# Altium PCB Driver_BLDC.PcbDoc (part 1 of 4)
Units mm, origin at the board's own origin, x right, y up, seen from the top; angles counter-clockwise.
Board outline 320 x 180.01 mm, 2 copper layers (Top Layer, Bottom Layer), stack 1.371 mm thick; 421 components, 171 nets, 1112 pads, 449 vias.
Unrouted connection lines stored in the file: 1.
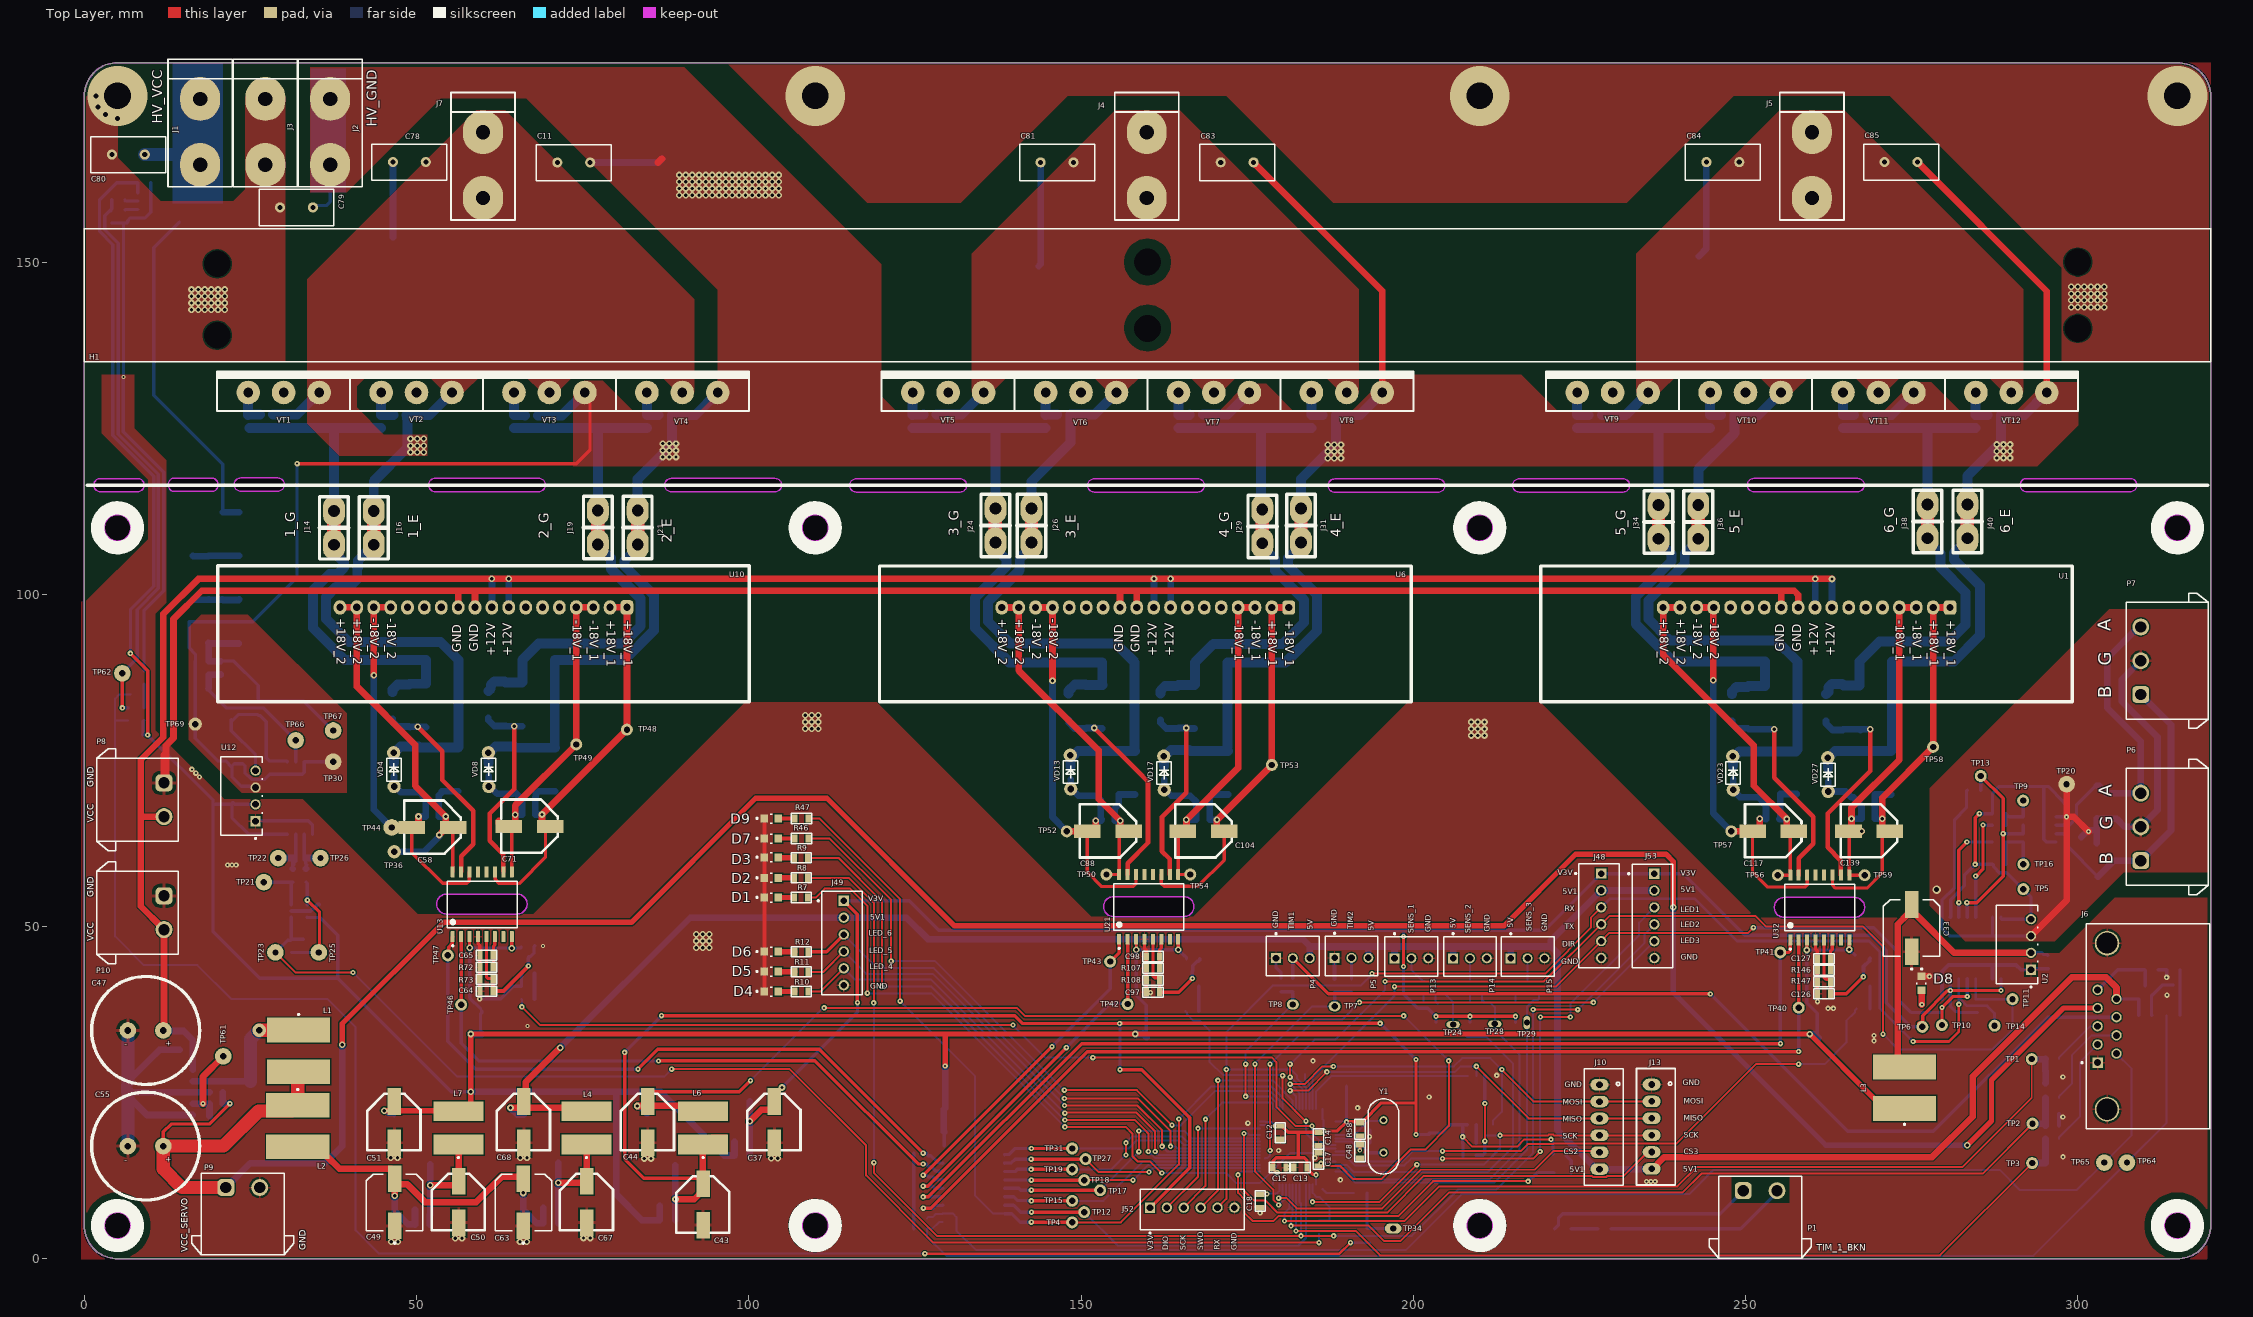
[diagram p0: Top Layer view]
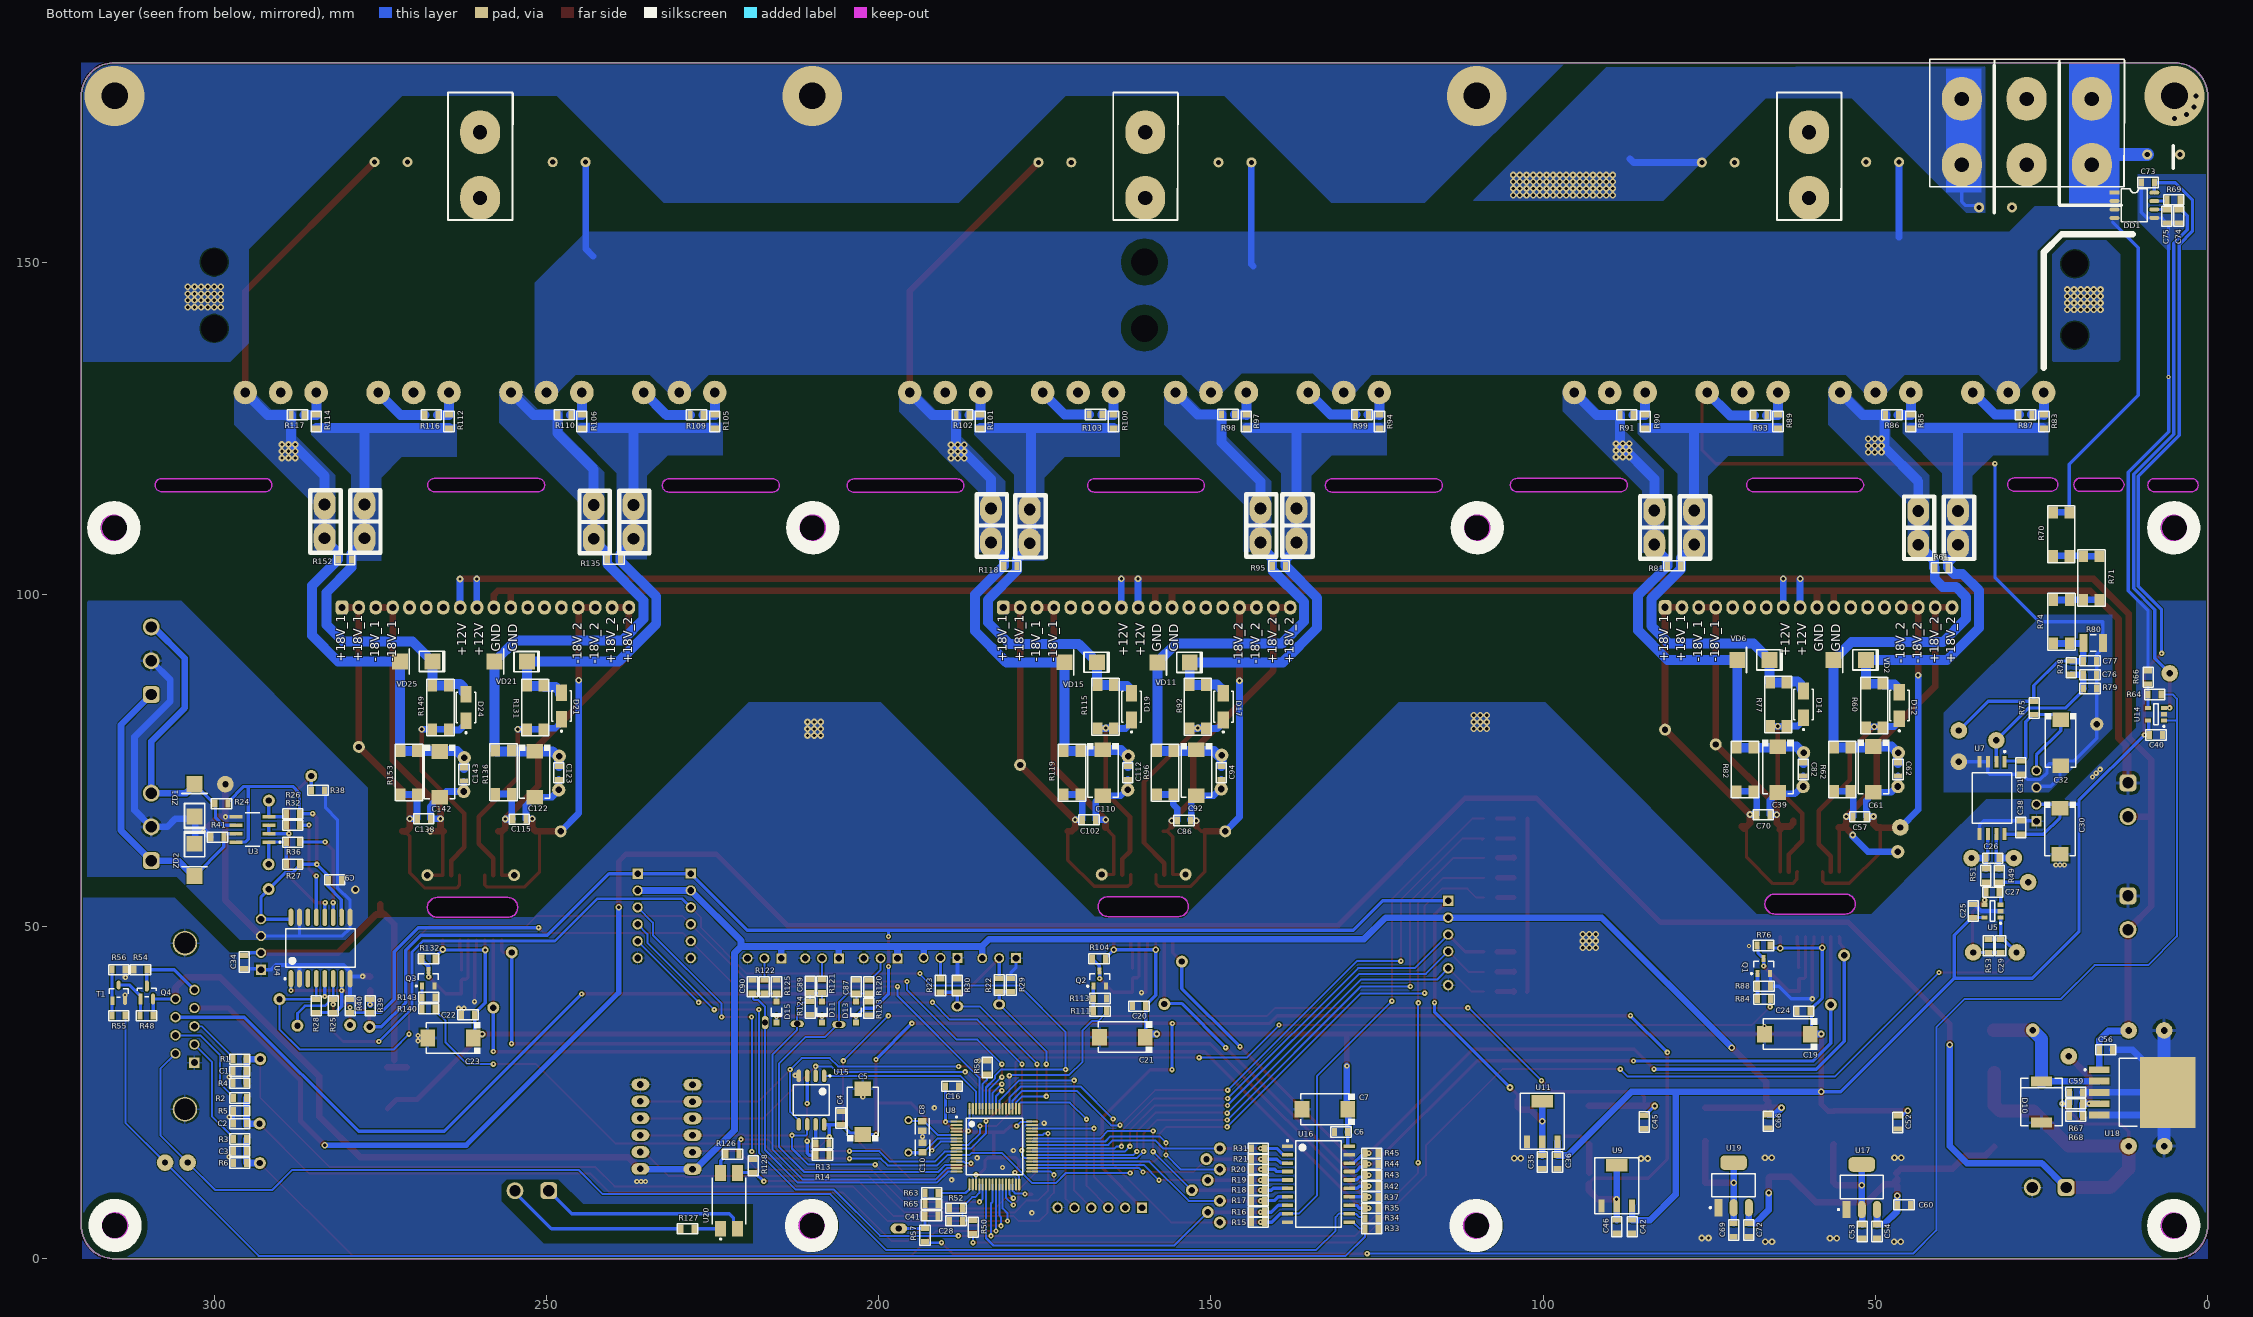
[diagram p1: Bottom Layer view, seen from below]
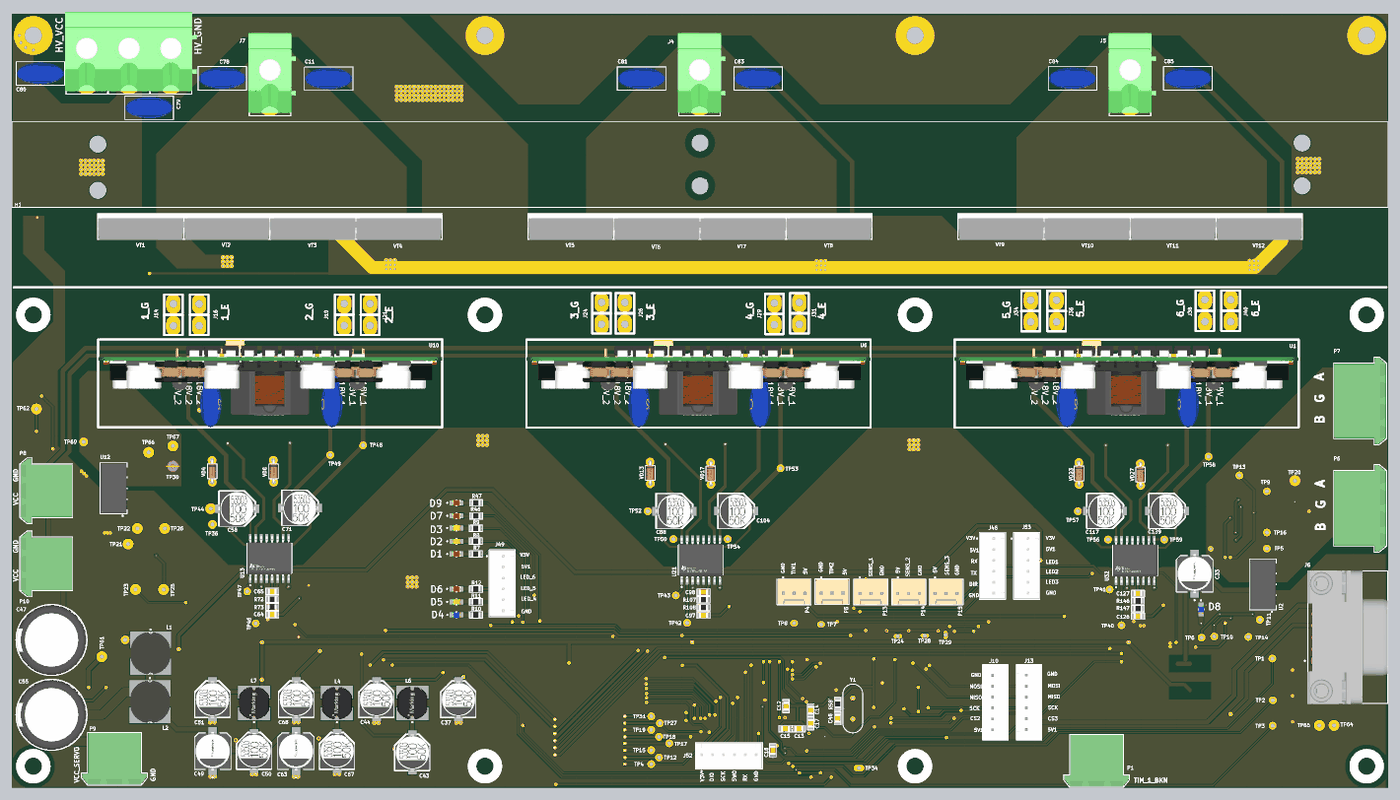
[diagram p4: 3D render of the assembled board from above, using the file's embedded part models]
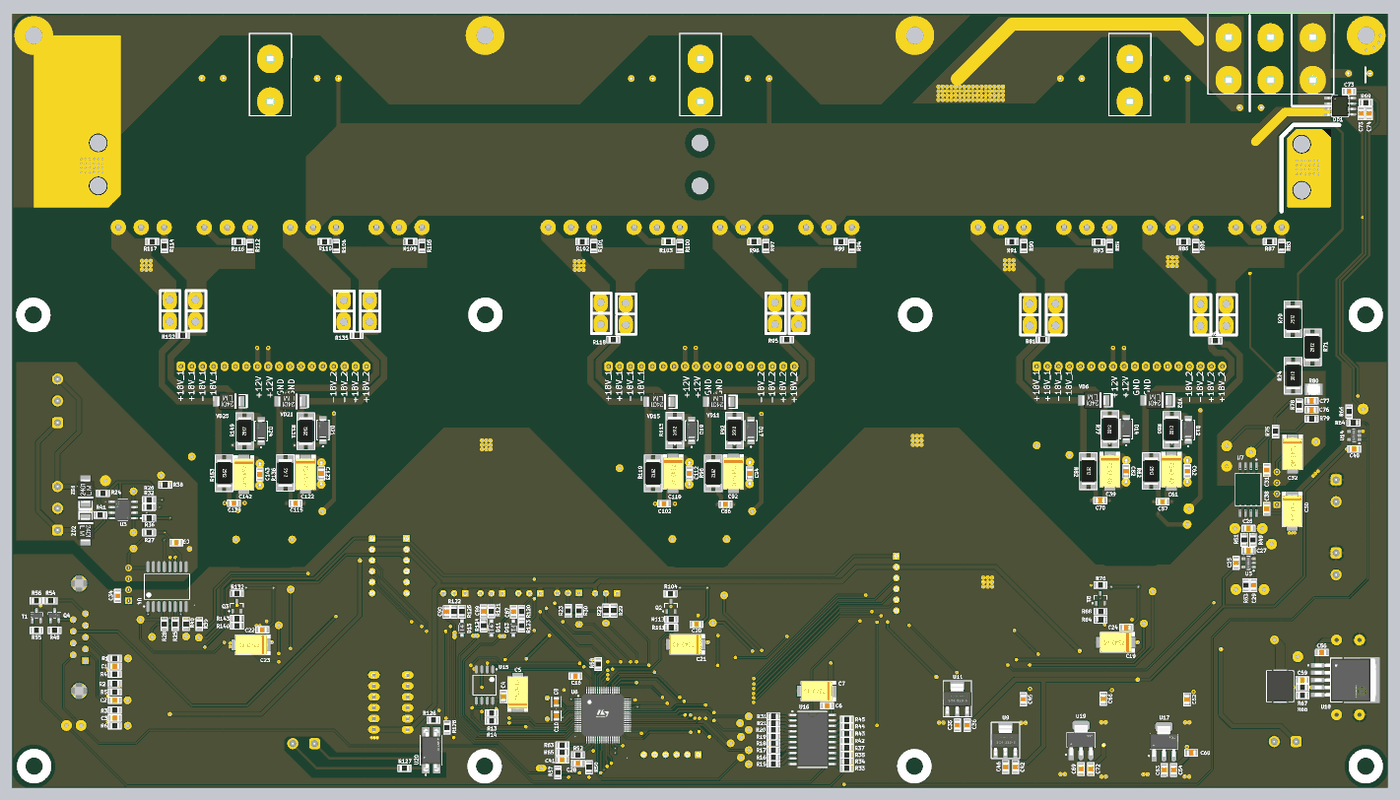
[diagram p5: 3D render of the assembled board from below, using the file's embedded part models]

## Layer stack, top to bottom
Top Solder: solder mask 0.0102, Solder Resist, Dk 3.5
Top Layer: signal copper 0.0356
Dielectric 1: dielectric 1.3, FR-4, Dk 4.8
Bottom Layer: signal copper 0.0356
Bottom Solder: solder mask 0.0102, Solder Resist, Dk 3.5

## Board outline
0,5 0,175.004 cw(c5,175.004) 5,180.004 5,180.011 315,180.011 315,180.004 cw(c315,175.004) 320,175.004 319.999,175.004 319.999,5 320,5 cw(c315,5) 315,0 5,0 cw(c5,5)
cut-out: 292.305,115.425 307.904,115.425 ccw(c307.904,116.425) 307.904,117.425 292.305,117.425 ccw(c292.305,116.425)
cut-out: 5,3 cw(c5,5) 3,5 cw(c5,5) 5,7 cw(c5,5) 7,5 cw(c5,5)
cut-out: 23.561,115.508 29.12,115.508 ccw(c29.12,116.508) 29.12,117.508 23.561,117.508 ccw(c23.561,116.508)
cut-out: 13.588,115.483 19.147,115.483 19.147,115.484 ccw(c19.147,116.484) 19.147,117.484 19.147,117.483 13.588,117.483 13.588,117.484 ccw(c13.588,116.484)
cut-out: 2.441,115.425 8,115.425 ccw(c8,116.425) 8,117.425 2.441,117.425 ccw(c2.441,116.425)
cut-out: 52.794,115.45 cw(c52.794,116.45) 52.794,117.45 68.393,117.45 cw(c68.393,116.45) 68.393,115.45
cut-out: 88.34,115.435 103.94,115.435 103.94,115.436 ccw(c103.94,116.436) 103.94,117.436 103.94,117.435 88.34,117.435 88.34,117.436 ccw(c88.34,116.436)
cut-out: 116.19,115.385 131.79,115.385 131.79,115.386 ccw(c131.79,116.386) 131.79,117.386 131.79,117.385 116.19,117.385 116.19,117.386 ccw(c116.19,116.386)
cut-out: 151.981,115.386 cw(c151.981,116.386) 151.981,117.386 151.981,117.385 167.58,117.385 167.58,117.386 cw(c167.58,116.386) 167.58,115.386 167.58,115.385
cut-out: 188.165,115.36 203.765,115.36 203.765,115.361 ccw(c203.765,116.361) 203.765,117.361 203.765,117.36 188.165,117.36 188.165,117.361 ccw(c188.165,116.361)
cut-out: 215.965,115.385 231.565,115.385 231.565,115.386 ccw(c231.565,116.386) 231.565,117.386 231.565,117.385 215.965,117.385 215.965,117.386 ccw(c215.965,116.386)
cut-out: 251.265,115.435 266.865,115.435 266.865,115.436 ccw(c266.865,116.436) 266.865,117.436 266.865,117.435 251.265,117.435 251.265,117.436 ccw(c251.265,116.436)
cut-out: 313,5 ccw(c315,5) 315,3 ccw(c315,5) 317,5 ccw(c315,5) 315,7 ccw(c315,5)
cut-out: 208,5 ccw(c210,5) 210,3 ccw(c210,5) 212,5 ccw(c210,5) 210,7 ccw(c210,5)
cut-out: 108,5 ccw(c110,5) 110,3 ccw(c110,5) 112,5 ccw(c110,5) 110,7 ccw(c110,5)
cut-out: 110,108.004 cw(c110,110.004) 108,110.004 cw(c110,110.004) 110,112.004 cw(c110,110.004) 112,110.004 cw(c110,110.004)
cut-out: 208,110.004 ccw(c210,110.004) 210,108.004 ccw(c210,110.004) 212,110.004 ccw(c210,110.004) 210,112.004 ccw(c210,110.004)
cut-out: 65.136,51.881 54.537,51.881 cw(c54.537,53.381) 54.537,54.881 65.136,54.881 cw(c65.136,53.381)
cut-out: 266.427,51.384 255.828,51.384 cw(c255.828,52.884) 255.828,54.384 266.427,54.384 cw(c266.427,52.884)
cut-out: 313,110.004 ccw(c315,110.004) 315,108.004 ccw(c315,110.004) 317,110.004 ccw(c315,110.004) 315,112.004 ccw(c315,110.004)
cut-out: 5,108.004 cw(c5,110.004) 3,110.004 cw(c5,110.004) 5,112.004 cw(c5,110.004) 7,110.004 cw(c5,110.004)
cut-out: 165.483,51.501 154.883,51.501 cw(c154.883,53.001) 154.883,54.501 165.483,54.501 cw(c165.483,53.001)

## Design rules (kind name [scope] priority, off if disabled: settings)
Clearance HV [InNetClass('All Nets') vs InNetClass('HV')] p1: gap=0.2 ignorepadtopadclearanceinfootprint=TRUE except(0: Text-Text Text-Hole; 0.4: THPad-THPad THPad-Via THPad-Fill THPad-Poly THPad-Region THPad-Text THPad-Hole Via-Via Via-Fill Via-Poly Via-Region Via-Text Via-Hole; 0.5: SMDPad-SMDPad SMDPad-THPad SMDPad-Via SMDPad-Fill SMDPad-Poly SMDPad-Region SMDPad-Text SMDPad-Hole Fill-Fill Fill-Poly Fill-Region Fill-Text Fill-Hole Poly-Poly Poly-Region Poly-Text Poly-Hole Region-Region Region-Text Region-Hole)
Clearance Clearance_1 [All] p2: gap=0.18 ignorepadtopadclearanceinfootprint=TRUE
Clearance GND [InNet('GND')] p3: gap=0.4 ignorepadtopadclearanceinfootprint=TRUE except(0.3: Text-Text Text-Hole)
ComponentClearance [All] p1: gap=-2.254 collisioncheckmode=3 verticalgap=0.254 showdistances=FALSE
DiffPairsRouting [All] p1: maxlimit=0.254 minlimit=0.1 mostfreqgap=0.254 toplayer_minwidth=0.3 toplayer_maxwidth=2 toplayer_prefwidth=0.3 bottomlayer_minwidth=0.3 bottomlayer_maxwidth=2 bottomlayer_prefwidth=0.3 maxuncoupledlength=12.7
Height [All] p1: minheight=0 maxheight=100 prefheight=12.7
HoleSize [All] p1: absolutevalues=TRUE maxlimit=5 minlimit=0.025 maxpercent=80.000 minpercent=20.000
HoleToHoleClearance [All] p1: gap=0 allowstackedmicrovias=TRUE
LayerPairs [All] p1 off: enforce=TRUE
MinimumSolderMaskSliver [All] p1: minsoldermaskwidth=0.01
PlaneClearance [All] p1: clearance=0.4
PlaneConnect [All] p1: planeconnectstyle=Direct reliefexpansion=0.508 reliefentries=4 reliefconductorwidth=0.254 reliefairgap=0.254
PolygonConnect [All] p1: connectstyle=Direct reliefconductorwidth=0.254 reliefentries=4 polygonreliefangle="90 Angle" airgapwidth=0.254
RoutingCorners [All] p1: cornerstyle=45-Degree minsetback=0.2 maxsetback=0.2
RoutingVias [All] p1: holewidth=0.4 width=0.8 viastyle="Through Hole" minholewidth=0.254 minwidth=0.5 maxholewidth=0.75 maxwidth=1.5
ShortCircuit [All] p1: allowed=TRUE
SilkToSilkClearance [All] p1 off: silktosilkclearance=0.01
SilkToSolderMaskClearance [All] p1: minsilkscreentomaskgap=0 clearancetoexposedcopper=FALSE
SolderMaskExpansion [All] p1: expansion=0 istentingtop=FALSE
SupplyNets "Schematic Supply Nets_28" [InNet('GND_-24V_3')] p1: voltage=0.000
SupplyNets "Schematic Supply Nets_27" [InNet('+5V_RS')] p2: voltage=0.000
SupplyNets "Schematic Supply Nets_26" [InNet('+24V_6')] p3: voltage=0.000
SupplyNets "Schematic Supply Nets_25" [InNet('+24V_4')] p4: voltage=0.000
SupplyNets "Schematic Supply Nets_24" [InNet('VCC_ISO')] p5: voltage=0.000
SupplyNets "Schematic Supply Nets_23" [InNet('+24V_5')] p6: voltage=0.000
SupplyNets "Schematic Supply Nets_22" [InNet('+5V_HALL')] p7: voltage=0.000
SupplyNets "Schematic Supply Nets_21" [InNet('+3V3_MCU')] p8: voltage=0.000
SupplyNets "Schematic Supply Nets_20" [InNet('PE')] p9: voltage=0.000
SupplyNets "Schematic Supply Nets_19" [InNet('GND_-24V_4')] p10: voltage=0.000
SupplyNets "Schematic Supply Nets_18" [InNet('+24V_1')] p11: voltage=0.000
SupplyNets "Schematic Supply Nets_17" [InNet('+3V3_REF')] p12: voltage=0.000
SupplyNets "Schematic Supply Nets_16" [InNet('+650 VDC')] p13: voltage=0.000
SupplyNets "Schematic Supply Nets_15" [InNet('VCC')] p14: voltage=0.000
SupplyNets "Schematic Supply Nets_14" [InNet('+3V3')] p15: voltage=0.000
SupplyNets "Schematic Supply Nets_13" [InNet('GND_-24V_1')] p16: voltage=0.000
SupplyNets "Schematic Supply Nets_12" [InNet('+24V_2')] p17: voltage=0.000
SupplyNets "Schematic Supply Nets_11" [InNet('+8VDC')] p18: voltage=0.000
SupplyNets "Schematic Supply Nets_10" [InNet('GND_2')] p19: voltage=0.000
SupplyNets "Schematic Supply Nets_9" [InNet('+5V_ISO')] p20: voltage=0.000
SupplyNets "Schematic Supply Nets_8" [InNet('+5')] p21: voltage=0.000
SupplyNets "Schematic Supply Nets_7" [InNet('+24V_3')] p22: voltage=0.000
SupplyNets "Schematic Supply Nets_6" [InNet('GND -650VDC')] p23: voltage=0.000
SupplyNets "Schematic Supply Nets_5" [InNet('GND')] p24: voltage=0.000
SupplyNets "Schematic Supply Nets_4" [InNet('+V_Servo')] p25: voltage=0.000
SupplyNets "Schematic Supply Nets_3" [InNet('GND_-24V_5')] p26: voltage=0.000
SupplyNets "Schematic Supply Nets_2" [InNet('GND_-24V_6')] p27: voltage=0.000
SupplyNets "Schematic Supply Nets_1" [InNet('+5V_1')] p28: voltage=0.000
SupplyNets "Schematic Supply Nets" [InNet('GND_-24V_2')] p29: voltage=0.000
UnRoutedNet [All] p1: checkbadconnections=TRUE
Width [All] p1: maxlimit=10 minlimit=0.254 preferedwidth=2
16 further rules are at their usual default settings.

## Components (designator, comment, footprint, x,y, rotation, side; value= is the part's Value field where it differs from the comment)
C1 "330pF" CAP-0805 296.161,28.224 r180 bottom
C2 "330pF" CAP-0805 296.15,20.347 r180 bottom
C3 "330pF" CAP-0805 296.15,16.193 r180 bottom
C4 "100nF" CAP-0805 205.725,21.175 r270 bottom
C5 "16V 100uF" CAP-TAN-D 202.4,22.15 r90 bottom
C6 "100nF" CAP-0805 130.421,19.077 r180 bottom
C7 "47uF 16V" CAP-TAN-D 132.85,22.5 r0 bottom
C8 "16pF" FP-GRM21B-0_1-IPC_C 193.447,19.975 r270 bottom
C9 "0.1uF" CAP-0805 281.848,57.017 r0 bottom
C10 "16pF" FP-GRM21B-0_1-IPC_C 193.414,16.742 r90 bottom
C11 "2.2nF 2kV" CAP-V 73.66,164.983 r180 top
C12 "0.1uF" CAP-0805 180,18.975 r270 top
C13 "0.1uF" CAP-0805 183.007,13.742 r180 top
C14 "0.1uF" CAP-0805 185.74,18.021 r270 top
C15 "0.1uF" CAP-0805 179.851,13.742 r0 top
C16 "0.1uF" CAP-0805 188.977,25.942 r180 bottom
C17 "0.1uF" CAP-0805 185.741,14.975 r270 top
C18 "2.2uF" CAP-0805 176.95,8.7 r90 top
C19 "47uF 16V" CAP-TAN-D 63.246,33.818 r0 bottom
C20 "1uF" CAP-0805 160.811,38.03 r180 bottom
C21 "47uF 16V" CAP-TAN-D 163.325,33.35 r0 bottom
C22 "1uF" CAP-0805 261.812,36.734 r180 bottom
C23 "47uF 16V" CAP-TAN-D 264.439,33.233 r0 bottom
C24 "1uF" CAP-0805 60.796,37.253 r180 bottom
C25 "0.1uF" CAP-0805 35.293,52.325 r270 bottom
C26 "47pF" CAP-0805 32.365,60.305 r180 bottom locked
C27 "47pF" CAP-0805 32.365,55.148 r180 bottom
C28 "1000pF" CAP-0805 188.386,5.7 r180 bottom
C29 "0.1uF" CAP-0805 31.185,47.105 r90 bottom locked
C30 "47uF 16V" CAP-TAN-D 22.225,64.338 r270 bottom
C31 "0.1uF" CAP-0805 28.125,73.9 r90 bottom
C32 "100uF 16V" CAP-TAN-D 22.125,77.65 r270 bottom
C33 "1000uF 10V" CAP_SMD_Size_G 275,49.769 r90 top
C34 "1uF" CAP-0805 295.483,44.648 r90 bottom
C35 "0.1uF" CAP-0805 100.15,14.55 r90 bottom
C36 "0.1uF" CAP-0805 97.85,14.55 r90 bottom
C37 "1000uF_6.3V" CAP_SMD_Size_E 103.85,20.5 r90 top locked
C38 "0.1uF" CAP-0805 28.15,64.9 r90 bottom
C39 "100uF 16V" CAP-TAN-D 64.686,73.631 r270 bottom
C40 "0.1uF" CAP-0805 7.798,78.817 r0 bottom
C41 "220pF" CAP-0805 192.064,6.465 r0 bottom
C42 "0.1uF" CAP-0805 86.625,4.825 r90 bottom
C43 "1000uF_6.3V" CAP_SMD_Size_E 93.125,8.125 r90 top
C44 "1000uF_6.3V" CAP_SMD_Size_E 84.8,20.5 r90 top locked
C45 "0.1uF" CAP-0805 84.8,20.575 r90 bottom
C46 "0.1uF" CAP-0805 88.925,4.825 r90 bottom
C47 "25V_1000uF" "HITANO 3300uF 25V  16x25" 9.231,34.362 r180 top
C48 "2.2uF" CAP-0805 191.982,16.149 r90 top
C49 "1000uF 10V" CAP_SMD_Size_G 46.7,8.5 r90 top locked
C50 "1000uF_6.3V" CAP_SMD_Size_E 56.35,8.5 r90 top locked
C51 "1000uF_6.3V" CAP_SMD_Size_E 46.66,20.5 r90 top locked
C52 "0.1uF" CAP-0805 46.66,20.525 r90 bottom
C53 "0.1uF" CAP-0805 52.01,4.1 r90 bottom
C54 "0.1uF" CAP-0805 49.77,4.1 r90 bottom
C55 "25V_1000uF" "HITANO 3300uF 25V  16x25" 9.231,16.963 r180 top
C56 "1uF" CAP-0805 15.327,31.441 r0 bottom
C57 "1uF" CAP-0805 52.366,66.531 r0 bottom
C58 "35V 220uF" CAP_SMD_Size_E 52.326,64.911 r0 top
C59 "0.1uF" CAP-0805 19.848,25.04 r0 bottom
C60 "0.1uF" CAP-0805 45.7,8.105 r0 bottom
C61 "100uF 16V" CAP-TAN-D 50.321,73.645 r270 bottom
C62 "0.1uF" CAP-0805 46.598,73.645 r90 bottom
C63 "1000uF 10V" CAP_SMD_Size_G 66.075,8.5 r90 top locked
C64 "100nF" CAP-0805 60.542,40.272 r0 top
C65 "2.2nF" CAP-0805 60.542,45.661 r0 top
C66 "0.1uF" CAP-0805 66.15,20.681 r90 bottom
C67 "1000uF_6.3V" CAP_SMD_Size_E 75.625,8.5 r90 top locked
C68 "1000uF_6.3V" CAP_SMD_Size_E 66.15,20.5 r90 top locked
C69 "0.1uF" CAP-0805 71.35,4.333 r90 bottom
C70 "1uF" CAP-0805 66.876,66.811 r0 bottom
C71 "35V 220uF" CAP_SMD_Size_E 66.926,65.061 r0 top
C72 "0.1uF" CAP-0805 69.06,4.333 r90 bottom
C73 "100nF" CAP-0805 9.002,161.979 r180 bottom
C74 "270pF" CAP-0805 4.354,156.874 r90 bottom
C75 "0.1uF" CAP-0805 6.182,156.874 r90 bottom
C76 "0.33uF" CAP-0805 17.723,87.913 r0 bottom
C77 "0.1uF" CAP-0805 17.725,89.975 r0 bottom
C78 "2.2nF 2kV" CAP-V 48.92,165.059 r180 top
C79 "10nF 2kV" CAP-V 31.925,158.225 r180 top
C80 "10nF 2kV" CAP-V 6.625,166.175 r180 top
C81 "2.2nF 2kV" CAP-V 146.394,165.004 r180 top
C82 "0.1uF" CAP-0805 60.856,73.645 r90 bottom
C83 "2.2nF 2kV" CAP-V 173.496,165.004 r180 top
C84 "2.2nF 2kV" CAP-V 246.583,165.034 r180 top
C85 "2.2nF 2kV" CAP-V 273.394,165.059 r180 top
C86 "1uF" CAP-0805 154.073,65.951 r0 bottom
C87 "330pF" CAP-0805 203.372,40.952 r270 bottom
C88 "35V 220uF" CAP_SMD_Size_E 153.981,64.321 r0 top
C89 "330pF" CAP-0805 210.322,41.027 r270 bottom
C90 "330pF" CAP-0805 218.992,40.952 r270 bottom
C92 "100uF 16V" CAP-TAN-D 152.193,73.141 r270 bottom
C94 "0.1uF" CAP-0805 148.427,73.14 r90 bottom
C97 "100nF" CAP-0805 160.813,40.118 r0 top
C98 "2.2nF" CAP-0805 160.813,45.49 r0 top
C102 "1uF" CAP-0805 168.353,66.051 r0 bottom
C104 "35V 220uF" CAP_SMD_Size_E 168.353,64.331 r0 top
C110 "100uF 16V" CAP-TAN-D 166.273,73.141 r270 bottom
C112 "0.1uF" CAP-0805 162.503,73.141 r90 bottom
C115 "1uF" CAP-0805 254.087,66.164 r0 bottom
C117 "35V 220uF" CAP_SMD_Size_E 254.107,64.354 r0 top
C122 "100uF 16V" CAP-TAN-D 251.787,72.924 r270 bottom
C123 "0.1uF" CAP-0805 248.126,73.135 r90 bottom
C126 "100nF" CAP-0805 261.812,39.894 r0 top
C127 "2.2nF" CAP-0805 261.812,45.174 r0 top
C138 "1uF" CAP-0805 268.457,66.204 r0 bottom
C139 "35V 220uF" CAP_SMD_Size_E 268.537,64.354 r0 top
C142 "100uF 16V" CAP-TAN-D 266.088,72.894 r270 bottom
C143 "0.1uF" CAP-0805 262.418,72.894 r90 bottom
D1 "151031YS06000" LED_RED 103.375,54.366 r0 top
D2 "151031YS06000" LED_GREEN 103.375,57.309 r0 top
D3 "151031YS06000" LED_YELLOW 103.38,60.423 r0 top
D4 "151031YS06000" LED_BLUE 103.375,40.216 r0 top
D5 "151031YS06000" LED_GREEN 103.375,43.216 r0 top
D6 "151031YS06000" LED_RED 103.38,46.216 r0 top
D7 "151031YS06000" LED_RED 103.38,63.245 r0 top
D8 "151031YS06000" LED_BLUE 276.475,41.45 r270 top
D9 "151031YS06000" LED_RED 103.38,66.255 r0 top
D10 "SS36" SMC/DO214AB 25.004,23.586 r270 bottom
D11 "1N4148" DIOD-SOD123-2_V 208.532,37.125 r270 bottom
D12 "US1G" US1G_SMA 46.406,83.261 r90 bottom
D13 "1N4148" DIOD-SOD123-2_V 203.407,37.125 r270 bottom
D14 "US1G" US1G_SMA 60.816,83.445 r90 bottom
D15 "1N4148" DIOD-SOD123-2_V 215.375,37.125 r270 bottom
D17 "US1G" US1G_SMA 148.143,83.081 r90 bottom
D19 "US1G" US1G_SMA 161.953,83.081 r90 bottom
D21 "US1G" US1G_SMA 247.73,83.204 r90 bottom
D24 "US1G" US1G_SMA 262.107,82.965 r90 bottom
DD1 "ACS724" SO8-150 11.034,158.55 r180 bottom locked
H1 "HEAT SINK" "HEAT SINK" 160,145.004 r180 top locked
J1 "MG_136_HT" Conn_MEIGAN_MG136HT 17.425,172 r180 top
J2 "MG_136_HT" Conn_MEIGAN_MG136HT 37,172 r180 top
J3 "MG_136_HT" Conn_MEIGAN_MG136HT 27.25,172 r180 top
J4 "MG_136_HT" Conn_MEIGAN_MG136HT 159.893,167.004 r180 top
J5 "MG_136_HT" Conn_MEIGAN_MG136HT 259.994,167.004 r180 top locked
J6 "DB9 pcb" "DB9 conn pcb" 304.405,35 r90 top locked
J7 "MG_136_HT" Conn_MEIGAN_MG136HT 60,167.004 r180 top
J10 "B6B-XH-TW" B6B-XH-TW 228.659,19.85 r270 top locked
J13 "B6B-XH-TW" B6B-XH-TW 236.5,19.875 r270 top locked
J14 "G(4)" Klema_PCB_15A 37.562,110.004 r270 top locked
J16 "E(5)" Klema_PCB_15A 43.562,110.004 r270 top locked
J19 "G(6)" Klema_PCB_15A 77.277,110.052 r270 top locked
J21 "E(7)" Klema_PCB_15A 83.277,110.052 r270 top locked
J24 "G" Klema_PCB_15A 137.109,110.348 r270 top
J26 "E" Klema_PCB_15A 142.545,110.348 r270 top
J29 "G" Klema_PCB_15A 177.278,110.221 r270 top
J31 "E" Klema_PCB_15A 183.094,110.348 r270 top
J34 "G" Klema_PCB_15A 236.888,110.89 r270 top
J36 "E" Klema_PCB_15A 242.888,110.89 r270 top
J38 "G" Klema_PCB_15A 277.38,110.966 r270 top
J40 "E" Klema_PCB_15A 283.38,110.966 r270 top
J48 "" Sullins_SWR25X-NRTC-S06-ST-BA_MFG 227.979,51.62 r270 top
J49 "" Sullins_SWR25X-NRTC-S06-ST-BA_MFG 114,47.52 r270 top
J52 "" Sullins_SWR25X-NRTC-S06-ST-BA_MFG 166.73,7.4 r0 top
J53 "" Sullins_SWR25X-NRTC-S06-ST-BA_MFG 235.979,51.61 r270 top
L1 "100uH CD105" WE-PD2_1054#1 32.25,31.275 r270 top
L2 "100uH CD105" WE-PD2_1054#1 32.125,19.986 r270 top
L3 "100uH CD105" WE-PD2_1054#2 -996.075,1295.725 r90 top
L4 "220uH CD75" WE-PD2_7850 75.575,19.7 r90 top locked
L6 "220uH CD75" WE-PD2_7850 93.125,19.7 r90 top locked
L7 "220uH CD75" WE-PD2_7850 56.3,19.7 r90 top locked
P1 "691305540002" 691305540002 252.2,6.25 r0 top
P4 "61900311121" 61900311121 181.871,45.537 r180 top
P5 "61900311121" 61900311121 190.701,45.587 r180 top
P6 "691305540003" 691305540003 313.475,65 r90 top locked
P7 "691305540003" 691305540003 313.475,90 r90 top locked
P8 "691305540002" 691305540002 8,69.079 r270 top locked
P9 "691305540002" 691305540002 23.85,6.725 r0 top
P10 "691305540002" 691305540002 8,52.079 r270 top locked
P13 "61900311121" 61900311121 199.717,45.525 r180 top
P14 "61900311121" 61900311121 208.532,45.525 r180 top
P15 "61900311121" 61900311121 217.202,45.525 r180 top
Q1 "BC847C" INF-SOT23_N 66.834,44.064 r90 bottom
Q2 "BC847C" INF-SOT23_N 166.76,42.17 r90 bottom
Q3 "BC847C" INF-SOT23_N 267.775,42.203 r90 bottom
Q4 "BSS84" FP-SOT23-IPC_A 310.149,40.075 r90 bottom
R1 "10K" RES-0805 296.161,30.054 r180 bottom
R2 "10K" RES-0805 296.15,24.189 r180 bottom
R3 "10K" RES-0805 296.15,18.025 r180 bottom
R4 "10K" RES-0805 296.161,26.425 r0 bottom
R5 "10K" RES-0805 296.15,22.252 r0 bottom
R6 "10K" RES-0805 296.15,14.425 r0 bottom
R7 "220" RES-0805 107.88,54.366 r0 top
R8 "220" RES-0805 107.88,57.366 r0 top
R9 "220" RES-0805 107.88,60.366 r0 top
R10 "220" RES-0805 107.905,40.216 r0 top
R11 "220" RES-0805 107.905,43.216 r0 top
R12 "220" RES-0805 107.905,46.216 r0 top
R13 "10K" RES-0805 208.475,17.35 r0 bottom
R14 "10K" RES-0805 208.475,15.575 r0 bottom
R15 "10K" RES-0805 142.896,5.512 r180 bottom
R16 "10K" RES-0805 142.896,7.057 r180 bottom
R17 "10K" RES-0805 142.896,8.727 r180 bottom
R18 "10K" RES-0805 142.896,10.317 r180 bottom
R19 "10K" RES-0805 142.896,11.827 r180 bottom
R20 "10K" RES-0805 142.896,13.457 r180 bottom
R21 "10K" RES-0805 142.896,15.002 r180 bottom
R22 "20K" RES-0805 181.871,41.193 r270 bottom
R23 "20K" RES-0805 190.701,41.127 r270 bottom
R24 "10K" RES-0805 298.916,68.507 r180 bottom
R25 "10K" RES-0805 282.096,38.078 r270 bottom
R26 "10K" RES-0805 288.176,66.982 r180 bottom
R27 "10K" RES-0805 288.176,59.367 r180 bottom
R28 "10K" RES-0805 284.636,38.078 r270 bottom
R29 "30K" RES-0805 180.081,41.193 r270 bottom
R30 "30K" RES-0805 188.161,41.127 r270 bottom
R31 "10K" RES-0805 142.896,16.602 r180 bottom
R32 "100" RES-0805 288.176,65.252 r180 bottom
R33 "10K" RES-0805 125.82,4.522 r0 bottom
R34 "10K" RES-0805 125.82,6.078 r0 bottom
R35 "10K" RES-0805 125.82,7.623 r0 bottom
R36 "100" RES-0805 288.176,62.712 r180 bottom
R37 "10K" RES-0805 125.82,9.292 r0 bottom
R38 "10K" RES-0805 284.396,70.487 r0 bottom
R39 "220" RES-0805 276.52,38.078 r270 bottom
R40 "10K" RES-0805 279.556,38.078 r270 bottom
R41 "10K" RES-0805 299.516,63.437 r180 bottom
R42 "10K" RES-0805 125.82,10.932 r0 bottom
R43 "10K" RES-0805 125.82,12.577 r0 bottom
R44 "10K" RES-0805 125.82,14.267 r0 bottom
R45 "10K" RES-0805 125.82,15.886 r0 bottom
R46 "220" RES-0805 107.929,63.245 r0 top
R47 "220" RES-0805 107.929,66.254 r0 top
R48 "10K" RES-0805 310.174,36.6 r0 bottom
R49 "10K" RES-0805 31.365,57.675 r270 bottom locked
R50 "1K" RES-0805 185.8,4.75 r270 bottom
R51 "10K" RES-0805 33.375,57.675 r270 bottom locked
R52 "47K" RES-0805 188.385,7.6 r0 bottom
R53 "10K" RES-0805 32.995,47.105 r90 bottom locked
R54 "1K" RES-0805 311.099,43.521 r180 bottom
R55 "1K" RES-0805 314.374,36.6 r0 bottom
R56 "10K" RES-0805 314.374,43.521 r180 bottom
R57 "10K" RES-0805 193.04,3.55 r90 bottom
R58 "10K" RES-0805 191.982,19.479 r90 top
R59 "10K" RES-0805 183.684,28.787 r270 bottom
R60 "10" RES-2512 50.196,83.261 r90 bottom
R61 "10K" RES-0805 40.075,103.998 r180 bottom
R62 "1K" RES-2512 55.016,73.645 r270 bottom
R63 "1K" RES-0805 192.025,9.896 r180 bottom
R64 "1K" RES-0805 7.976,84.922 r180 bottom
R65 "36K" RES-0805 192.04,8.235 r0 bottom
R66 "100K" RES-0805 8.976,87.512 r270 bottom
R67 "11K" RES-0805 19.848,23.338 r0 bottom
R68 "2K" RES-0805 19.848,21.476 r180 bottom
R69 "10K" RES-0805 5.116,159.392 r180 bottom
R70 "100K" RES-2512 22.05,109.05 r90 bottom
R71 "100K" RES-2512 17.5,102.45 r90 bottom
R72 "100K" RES-0805 60.542,43.851 r0 top
R73 "10K" RES-0805 60.532,42.062 r0 top
R74 "100K" RES-2512 22,95.875 r90 bottom
R75 "1K 1%" RES-0805 26.094,82.9 r270 bottom
R76 "3K" RES-0805 66.834,47.15 r0 bottom
R77 "10" RES-2512 64.626,83.445 r90 bottom
R78 "1K" RES-0805 20.55,88.95 r270 bottom
R79 "1M" RES-0805 17.7,85.825 r0 bottom
R80 "1K 1%" RES_SMD_1210_IPC_B 17.225,92.675 r0 bottom
R81 "10K" RES-0805 80.299,104.276 r180 bottom
R82 "1K" RES-2512 69.626,73.631 r270 bottom
R83 "5" RES-0805 24.638,126.004 r90 bottom locked
R84 "1K" RES-0805 66.784,39.083 r0 bottom
R85 "5" RES-0805 44.666,126.004 r90 bottom locked
R86 "1K" RES-0805 47.498,127.004 r180 bottom
R87 "1K" RES-0805 27.432,127.036 r180 bottom
R88 "10K" RES-0805 66.784,41.004 r180 bottom
R89 "5" RES-0805 64.666,126.004 r90 bottom locked
R90 "5" RES-0805 84.666,126.004 r90 bottom locked
R91 "1K" RES-0805 87.439,127.004 r180 bottom
R92 "10" RES-2512 151.973,83.081 r90 bottom
R93 "1K" RES-0805 67.31,126.934 r180 bottom
R94 "5" RES-0805 124.638,126.004 r90 bottom locked
R95 "10K" RES-0805 139.775,104.257 r180 bottom
R96 "1K" RES-2512 156.903,73.141 r270 bottom
R97 "5" RES-0805 144.666,126.004 r90 bottom locked
R98 "1K" RES-0805 147.422,127.061 r180 bottom
R99 "1K" RES-0805 127.279,127.036 r180 bottom
R100 "5" RES-0805 164.666,126.004 r90 bottom locked
R101 "5" RES-0805 184.709,126.004 r90 bottom locked
R102 "1K" RES-0805 187.376,127.01 r180 bottom
R103 "1K" RES-0805 167.361,127.061 r180 bottom
R104 "3K" RES-0805 166.862,45.142 r0 bottom
R105 "5" RES-0805 224.663,126.004 r90 bottom locked
R106 "5" RES-0805 244.666,126.004 r90 bottom locked
R107 "100K" RES-0805 160.813,43.72 r0 top
R108 "10K" RES-0805 160.813,41.938 r0 top
R109 "1K" RES-0805 227.406,127.004 r180 bottom
R110 "1K" RES-0805 247.32,127.004 r180 bottom
R111 "1K" RES-0805 166.709,37.268 r0 bottom
R112 "5" RES-0805 264.666,126.004 r90 bottom locked
R113 "10K" RES-0805 166.709,39.173 r180 bottom
R114 "5" RES-0805 284.632,126.004 r90 bottom locked
R115 "10" RES-2512 165.853,83.081 r90 bottom
R116 "1K" RES-0805 267.335,127.004 r180 bottom
R117 "1K" RES-0805 287.452,127.004 r180 bottom
R118 "10K" RES-0805 180.179,104.257 r180 bottom
R119 "1K" RES-2512 170.903,73.141 r270 bottom
R120 "10K" RES-0805 201.507,40.952 r270 bottom
R121 "10K" RES-0805 208.532,41.027 r270 bottom
R122 "10K" RES-0805 217.202,40.952 r270 bottom
R123 "10K" RES-0805 201.5,37.7 r270 bottom
R124 "10K" RES-0805 210.322,37.725 r270 bottom
R125 "10K" RES-0805 215.375,40.952 r90 bottom
R126 "1K" RES-0805 222.015,15.753 r0 bottom
R127 "1K" RES-0805 228.775,4.525 r180 bottom
R128 "10K" RES-0805 218.894,13.994 r90 bottom
R131 "10" RES-2512 251.702,82.959 r90 bottom
R132 "3K" RES-0805 267.759,45.175 r0 bottom
R135 "10K" RES-0805 239.852,105.268 r180 bottom
R136 "1K" RES-2512 256.457,73.214 r270 bottom
R140 "1K" RES-0805 267.724,37.631 r0 bottom
R143 "10K" RES-0805 267.724,39.333 r180 bottom
R146 "100K" RES-0805 261.807,43.449 r0 top
R147 "10K" RES-0805 261.807,41.67 r0 top
R149 "10" RES-2512 265.957,82.965 r90 bottom
R152 "10K" RES-0805 280.34,105.242 r180 bottom
R153 "1K" RES-2512 270.698,73.154 r270 bottom
T1 "BC847C" SOT23-3_IPC_A 314.374,40.025 r90 bottom
TP1 "" Test_Point#1 293.072,30.054 r0 top
TP2 "" Test_Point#1 293.185,20.344 r0 top
TP3 "" Test_Point#1 293.135,14.41 r0 top
TP4 "Test_Point_PCB" Test_Point#1 148.66,5.477 r90 top
TP5 "Test_Point_PCB" Test_Point#1 291.806,55.633 r90 top
TP6 "" Test_Point#1 276.609,34.9 r180 top
TP7 "" Test_Point#2 188.161,37.987 r180 top
TP8 "" Test_Point#2 181.871,38.279 r180 top
TP9 "Test_Point_PCB" Test_Point#1 291.781,68.959 r90 top
TP10 "Test_Point_PCB" Test_Point#1 279.555,35.172 r180 top
TP11 "Test_Point_PCB" Test_Point#1 290.18,39.078 r270 top
TP12 "Test_Point_PCB" Test_Point#1 150.475,7.027 r180 top
TP13 "Test_Point_PCB" Test_Point#1 285.396,72.651 r180 top
TP14 "Test_Point_PCB" Test_Point#1 287.475,35.075 r270 top
TP15 "Test_Point_PCB" Test_Point#1 148.66,8.727 r180 top
TP16 "" Test_Point#1 291.806,59.367 r90 top
TP17 "Test_Point_PCB" Test_Point#1 152.871,10.317 r180 top
TP18 "Test_Point_PCB" Test_Point#1 150.475,11.827 r180 top
TP19 "Test_Point_PCB" Test_Point#1 148.66,13.457 r180 top
TP20 "Test_Point_PCB" Test_Point#3 298.316,71.428 r180 top
TP21 "Test_Point_PCB" Test_Point#3 27.025,56.685 r270 top locked
TP22 "Test_Point_PCB" Test_Point#3 29.185,60.305 r270 top locked
TP23 "Test_Point_PCB" Test_Point#3 28.765,46.105 r270 top locked
TP24 "" Test_Point#4 206,35.25 r90 top
TP25 "Test_Point_PCB" Test_Point#3 35.293,46.105 r270 top locked
TP26 "Test_Point_PCB" Test_Point#3 35.545,60.305 r270 top locked
TP27 "Test_Point_PCB" Test_Point#1 150.683,15.002 r180 top
TP28 "" Test_Point#4 212.264,35.353 r90 top
TP29 "" Test_Point#4 217.1,35.55 r180 top
TP30 "Test_Point_PCB" Pin_Test_Point(Pink) 37.446,74.8 r90 top
TP31 "Test_Point_PCB" Test_Point#1 148.66,16.602 r180 top
TP34 "Test_Point_PCB" Test_Point#5 196.975,4.55 r90 top
TP36 "Test_Point_PCB" Test_Point#6 46.654,61.25 r180 top
TP40 "Test_Point_PCB" Test_Point#1 258.002,37.788 r180 top
TP41 "Test_Point_PCB" Test_Point#1 255.223,46.105 r180 top
TP42 "Test_Point_PCB" Test_Point#1 157.008,38.337 r180 top
TP43 "Test_Point_PCB" Test_Point#1 154.374,44.728 r180 top
TP44 "Test_Point_PCB" Test_Point#3 46.252,64.911 r180 top
TP46 "Test_Point_PCB" Test_Point#1 56.711,38.232 r180 top
TP47 "Test_Point_PCB" Test_Point#1 54.714,45.661 r180 top
TP48 "Test_Point_PCB" Test_Point#1 81.661,79.635 r180 top
TP49 "Test_Point_PCB" Test_Point#1 74.041,77.404 r180 top
TP50 "Test_Point_PCB" Test_Point#1 153.823,57.836 r180 top
TP52 "Test_Point_PCB" Test_Point#1 147.856,64.321 r90 top
TP53 "Test_Point_PCB" Test_Point#1 178.714,74.317 r180 top
TP54 "Test_Point_PCB" Test_Point#1 166.439,57.836 r180 top
TP56 "Test_Point_PCB" Test_Point#1 254.871,57.729 r180 top
TP57 "Test_Point_PCB" Test_Point#1 247.86,64.326 r180 top
TP58 "Test_Point_PCB" Test_Point#1 278.232,77.032 r180 top
TP59 "Test_Point_PCB" Test_Point#1 267.927,57.729 r180 top
TP61 "" Test_Point#3 20.914,30.47 r180 top
TP62 "Test_Point_PCB" Test_Point#3 5.724,88.112 r90 top
TP64 "Test_Point_PCB" Test_Point#3 307.4,14.48 r90 top
TP65 "Test_Point_PCB" Test_Point#3 304.005,14.48 r90 top
TP66 "Test_Point_PCB" Test_Point#3 31.815,78.014 r90 top
TP67 "Test_Point_PCB" Test_Point#3 37.446,79.505 r90 top
TP69 "Test_Point_PCB" Test_Point#6 16.7,80.466 r90 top
U1 "DC-DC" DC-DC_Bridge 219.177,99.304 r180 top
U2 "B0505S-1W" B0505S-1W 290.861,47.308 r90 top locked
U3 "MAX485" SOIC-8-MFG 294.246,64.617 r0 bottom
U4 "ADUM1401BRWZ" ADI-RW-16_M 284.001,46.768 r90 bottom
U5 "AD8605ARZ" SOT-23-5 32.365,52.325 r0 bottom
U6 "DC-DC" DC-DC_Bridge 119.659,99.304 r180 top locked
U7 "AMC1311" FP-DWV0008A-MFG 32.45,69.35 r270 bottom
U8 "STM32F722RET6" LQFP64-5W-IPC_A 182.601,16.881 r180 bottom locked
U9 "AMS1117-3v3" SOT-223-3 88.925,11 r180 bottom
U10 "DC-DC" DC-DC_Bridge 20.066,99.323 r180 top locked
U11 "AMS1117-3v3" SOT-223-3 100.15,20.675 r180 bottom
U12 "B0505S-1W" B0505S-1W 23.675,69.655 r90 top
U13 "UCC21520DW" FP-DW0016B-MFG 59.886,53.351 r90 top
U14 "AD8605ARZ" SOT-23-5 7.798,81.95 r0 bottom
U15 "W25Q128" WINB-SOIC-8_M 210.125,23.875 r270 bottom
U16 "SN74HC541DWR" DW0020A_L 133.821,11.227 r180 bottom
U17 "AMS1117-5V1" SOT-223 52.06,10.8 r180 bottom
U18 "LM2576HVS-ADJ" ON_Semiconductor_936A-02_MFG 9.85,25.04 r270 bottom
U19 "AMS1117-5V1" SOT-223 71.35,11.082 r180 bottom
U20 "PC817XN" FP-PC817XNNIP0F-MFG 222.525,8.725 r90 bottom
U21 "UCC21520DW" FP-DW0016B-MFG 160.183,52.961 r90 top
U32 "UCC21520DW" FP-DW0016B-MFG 261.177,52.854 r90 top
VD2 "SMBJ18CA" DO-214AA 55.936,90.131 r180 bottom
VD4 "5.1V" DO-35 46.598,73.645 r270 top
VD6 "SMBJ18CA" DO-214AA 70.416,90.131 r180 bottom
VD8 "5.1V" DO-35 60.856,73.645 r270 top
VD11 "SMBJ18CA" DO-214AA 157.693,89.761 r180 bottom
VD13 "5.1V" DO-35 148.427,73.28 r270 top
VD15 "SMBJ18CA" DO-214AA 171.653,89.771 r180 bottom
VD17 "5.1V" DO-35 162.503,73.141 r270 top
VD21 "SMBJ18CA" DO-214AA 257.427,89.864 r180 bottom
VD23 "5.1V" DO-35 248.126,73.135 r270 top
VD25 "SMBJ18CA" DO-214AA 271.667,89.904 r180 bottom
VD27 "5.1V" DO-35 262.418,72.894 r270 top
VT1 "IGBT 75N120T" TO-264-3 30,131.004 r0 top
VT2 "IGBT 75N120T" TO-264-3 50,131.004 r0 top
VT3 "IGBT 75N120T" TO-264-3 70,131.004 r0 top
VT4 "IGBT 75N120T" TO-264-3 90,131.004 r0 top
VT5 "IGBT 75N120T" TO-264-3 130,131.004 r0 top
VT6 "IGBT 75N120T" TO-264-3 150,131.004 r0 top
VT7 "IGBT 75N120T" TO-264-3 170,131.004 r0 top
VT8 "IGBT 75N120T" TO-264-3 190,131.004 r0 top
VT9 "IGBT 75N120T" TO-264-3 230,131.004 r0 top
VT10 "IGBT 75N120T" TO-264-3 250,131.004 r0 top
VT11 "IGBT 75N120T" TO-264-3 270,131.004 r0 top
VT12 "IGBT 75N120T" TO-264-3 290,131.004 r0 top
Y1 "16MHZ" FOX-FOXSLF-2_V 195.524,18.421 r90 top
ZD1 "P6SMB16CA" DO-214AA 302.946,71.047 r270 bottom
ZD2 "P6SMB16CA" DO-214AA 302.946,57.962 r90 bottom

## Footprints (in the part's own frame and the unit in brackets; to place one, negate y for a bottom-side part, rotate by r counter-clockwise, add the part's x,y. Pads: shape width x height; smd on the part's side, far side on the other; paste and mask are expansions set on the pad)
61900311121 [mm] "2.54mm Male Locking Header, 3p"
  rect 1.5x1.5 hole 1: 1(2.54,0.3)
  round 1.5 hole 1: 2(0,0.3) 3(-2.54,0.3)
  silkscreen extent -3.98,-3.52 3.98,2.98, body extent -3.81,-2.9 3.81,2.9, height 11.53
691305540002 [mm] "5,08mm - PCB Header Horizontal Entry with Plastic Latches - 02p"
  rrect50% 2.55x2.55 hole 1.7: 1(-2.54,4)
  round 2.55 hole 1.7: 2(2.54,4)
  silkscreen extent -7.65,-6.15 7.65,6.15, body extent -7.48,-6 7.48,6, height 8.63
691305540003 [mm] "5,08mm - PCB Header Horizontal Entry with Plastic Latches - 03p"
  rrect50% 2.55x2.55 hole 1.7: 1(-5.08,4)
  round 2.55 hole 1.7: 2(0,4) 3(5.08,4)
  silkscreen extent -10.19,-6.15 10.19,6.15, body extent -10.02,-6 10.02,6, height 8.63
ADI-RW-16_M [mm] "SOIC, 16-Leads, Body 10.3x7.5mm, Pitch 1.27mm, IPC Low Density"
  oval 2.6x0.7 smd: 1(-4.625,4.445) 2(-4.625,3.175) 3(-4.625,1.905) 4(-4.625,0.635) 5(-4.625,-0.635) 6(-4.625,-1.905) 7(-4.625,-3.175) 8(-4.625,-4.445) 9(4.625,-4.445) 10(4.625,-3.175) 11(4.625,-1.905) 12(4.625,-0.635) 13(4.625,0.635) 14(4.625,1.905) 15(4.625,3.175) 16(4.625,4.445)
  silkscreen extent -4.75,-5.25 2.93,5.47, body extent -3.8,-5.25 3.8,5.25, height 2.65
B6B-XH-TW [mm]
  oval 1.75x2.7 hole 1: 1(-6.35,-0.635) 2(-3.81,-0.635) 3(-1.27,-0.635) 4(1.27,-0.635) 5(3.81,-0.635) 6(6.35,-0.635)
  silkscreen extent -8.76,-2.92 8.76,2.92, body extent -8.75,-2.88 8.75,2.88, height 6.88
B0505S-1W [mm]
  rect 1.55x1.55 hole 1 paste-2539.97 mask+0: 1(-3.81,-2.1)
  round 1.55 hole 1 paste-2539.97 mask+0: 2(-1.27,-2.1) 3(1.27,-2.1) 4(3.81,-2.1)
  silkscreen extent -6.52,-3.13 5.92,3.13, body extent -6.02,-3.22 6.02,3.22, height 0.25
CAP-0805 [mm]
  rect 0.8x1.25 smd mask+0.015: 1(-1,0) 2(1,0)
  silkscreen extent -1.52,-0.76 1.52,0.76, body extent -1,-0.62 1,0.63, height 0.8
CAP-TAN-D [mm]
  rect 2.2x2.5 smd: 1(-3.45,0) 2(3.45,0)
  silkscreen extent -4.5,-2.4 3.65,2.4, body extent -3.8,-2.3 3.8,2.3, height 4
CAP-V [mil]
  round 60 hole 30: 1(-97.44,0) 2(97.44,0)
  silkscreen extent -222,-106 221,108, body extent -216,-98 216,98, height 610
CAP_SMD_Size_E [mm]
  rect 4x2 smd: 1(3.175,0) 2(-3.048,0)
  silkscreen extent -4.19,-3.94 4.32,4.06, body extent -4.25,-4 4.25,4, height 10.59
CAP_SMD_Size_G [mm]
  rect 4x2 smd paste+0 mask+0: 1(3.55,0) 2(-3.55,0)
  silkscreen extent -6.27,-4.25 4.25,4.25, body extent -5.8,-4.5 5.8,4.5, height 0.25
Conn_MEIGAN_MG136HT [mm]
  oval 6x6.6 hole 2.159: 1(0,7.366) 1(0,-2.54)
  silkscreen extent -4.83,-8.51 4.83,10.67, body extent -6,-8.55 5,9.95, height 30.95
"DB9 conn pcb" [mm] "DB9 conn pcb"
  rect 1.55x1.55 hole 1.04: 1(-5.485,1.42)
  round 1.55 hole 1.04: 2(-2.745,1.42) 3(-0.005,1.42) 4(2.735,1.42) 5(5.475,1.42) 6(-4.115,-1.42) 7(-1.375,-1.42) 8(1.365,-1.42) 9(4.105,-1.42)
  round 3.7 hole 3.17: MH1(-12.495,0) MH2(12.495,0)
  silkscreen extent -15.4,-15.49 15.41,3.9, body extent -15.52,-15.48 15.52,3.12, height 12.77
DC-DC_Bridge [mm]
  rrect50% 1.905x2.159 hole 1.1: 1(-61.595,1.294)
  oval 1.905x2.159 hole 1.1: 2(-59.055,1.294) 3(-56.515,1.294) 4(-53.975,1.294) 5(-51.435,1.294) 6(-48.895,1.294) 7(-46.355,1.294) 8(-43.815,1.294) 9(-41.275,1.294) 10(-38.735,1.294) 11(-36.195,1.294) 12(-33.655,1.294) 13(-31.115,1.294) 14(-28.575,1.294) 15(-26.035,1.294) 16(-23.495,1.294) 17(-20.955,1.294) 18(-18.415,1.294)
  silkscreen extent -80.01,-4.95 -0.01,15.5, body extent -80,-4.89 0,15.5, height 84
DIOD-SOD123-2_V [mm] "SOD123, 2-Leads, Body 2.7x1.55mm, Height 1.45mm"
  rect 0.9x0.95 smd: 1(1.575,0) 2(-1.575,0)
  silkscreen extent -0.64,-0.82 0.64,0.77, body extent -1.88,-0.8 1.88,0.8, height 1.3
DO-35 [mm]
  round 2 hole 1: 1(-2.5,-0.05) 2(2.575,0.025)
  silkscreen extent -1.68,-1.1 1.75,1.1, body extent -2.82,-0.9 2.82,0.9, height 1.82
DO-214AA [mm]
  rect 2.4x2.4 smd: 1(-0.381,0) 2(4.5,0)
  silkscreen extent 1.02,-1.91 6.35,1.91, body extent -0.75,-1.97 4.85,1.97, height 2.65
DW0020A_L [mm] "SOIC, 20-Leads, Body 13x7.6mm, Pitch 1.27mm, IPC High Density"
  rrect18% 1.7x0.55 smd: 1(-4.65,5.715) 2(-4.65,4.445) 3(-4.65,3.175) 4(-4.65,1.905) 5(-4.65,0.635) 6(-4.65,-0.635) 7(-4.65,-1.905) 8(-4.65,-3.175) 9(-4.65,-4.445) 10(-4.65,-5.715) 11(4.65,-5.715) 12(4.65,-4.445) 13(4.65,-3.175) 14(4.65,-1.905) 15(4.65,-0.635) 16(4.65,0.635) 17(4.65,1.905) 18(4.65,3.175) 19(4.65,4.445) 20(4.65,5.715)
  silkscreen extent -4.78,-6.5 3.4,6.66, body extent -5.16,-6.4 5.16,6.4, height 2.52
FOX-FOXSLF-2_V [mm] "THD, 2-Leads, Body 11.35x4.65mm, Pitch 4.88mm"
  round 1.2 hole 0.7: 1(-2.44,0) 2(2.44,0)
  silkscreen extent -5.68,-2.32 5.68,2.32, body extent -5.67,-2.32 5.68,2.32, height 3.6
FP-DW0016B-MFG [mm]
  rrect17% 1.65x0.6 smd paste+0 mask+0: 1(-4.875,4.445) 2(-4.875,3.175) 3(-4.875,1.905) 4(-4.875,0.635) 5(-4.875,-0.635) 6(-4.875,-1.905) 7(-4.875,-3.175) 8(-4.875,-4.445) 9(4.875,-4.445) 10(4.875,-3.175) 11(4.875,-1.905) 12(4.875,-0.635) 13(4.875,0.635) 14(4.875,1.905) 15(4.875,3.175) 16(4.875,4.445)
  silkscreen extent -6.37,-5.25 3.5,5.25, body extent -5.15,-5.15 5.15,5.15, height 2.65
FP-DWV0008A-MFG [mm]
  rect 1.8x0.6 smd paste+0 mask+0: 1(-5.45,1.905) 2(-5.45,0.635) 3(-5.45,-0.635) 4(-5.45,-1.905) 5(5.45,-1.905) 6(5.45,-0.635) 7(5.45,0.635) 8(5.45,1.905)
  silkscreen extent -7.1,-2.98 3.8,2.98, body extent -5.75,-2.93 5.75,2.93, height 2.8
FP-GRM21B-0_1-IPC_C [mm]
  rect 0.958x1.262 smd paste+0 mask+0: 1(-0.727,0) 2(0.727,0)
  silkscreen extent -1.21,-1.07 1.21,1.07, body extent -1,-0.63 1,0.63, height 1.35
FP-PC817XNNIP0F-MFG [mm]
  rect 2.4x1.7 smd paste+0 mask+0: 1(-4.2,1.27) 2(-4.2,-1.27) 3(4.2,-1.27) 4(4.2,1.27)
  silkscreen extent -5.87,-2.54 3.5,2.54, body extent -5,-2.29 5,2.29, height 4.6
FP-SOT23-IPC_A [mm]
  rect 1.655x0.602 smd paste+0 mask+0: 1(-0.975,0.95)
  rrect100% 1.655x0.602 smd paste+0 mask+0: 2(-0.975,-0.95) 3(0.975,0)
  silkscreen extent -0.65,-1.45 0.65,1.45, body extent -1.15,-1.45 1.15,1.45, height 1.1
"HEAT SINK" [mm]
  round 1.524 hole 4 unplated: 5(-140,-5) 5(-140,5) 5(0,5) 5(0,-5) 5(140,-4.722) 5(140,6.028)
  round 0 all layers, no hole: 5(-70,-5) 5(-70,5) 5(70,-4.722) 5(70,5.778)
  silkscreen extent -160,-10 160,10, body extent -160,-10 160,10, height 97.5
"HITANO 3300uF 25V  16x25" [mm]
  round 2.5 hole 1: 1(-2.667,0) 2(2.667,0)
  silkscreen extent -8.12,-8.12 8.12,8.12, body extent -8.15,-8.14 8.16,8.16, height 25.87
INF-SOT23_N [mm] "SOT23, 3-Leads, Body 2.9x1.3 mm, Pitch 0.95 mm, IPC Medium Density"
  rect 1.05x0.6 smd: 1(-1.15,0.95) 2(-1.15,-0.95) 3(1.15,0)
  silkscreen extent -1.27,-1.5 0.7,1.93, body extent -0.7,-1.5 0.7,1.5, height 1.1
Klema_PCB_15A [mil]
  oval 180x130 hole 70: 1(-100,0) 1(100,0)
  silkscreen extent -185,-85 185,85, body extent -161,-16 161,16, height 505
LED_BLUE [mm]
  rect 1.1x1.2 smd paste+0 mask+0: 1(1.05,0) 2(-1.05,0)
  silkscreen extent -2.27,-0.67 0.13,0.67, body extent -1,-0.63 1,0.63, height 0.8
LED_GREEN [mm]
  rect 1.1x1.2 smd paste+0 mask+0: 1(1.05,0) 2(-1.05,0)
  silkscreen extent -2.27,-0.67 0.13,0.67, body extent -1,-0.63 1,0.63, height 0.8
LED_RED [mm]
  rect 1.1x1.2 smd paste+0 mask+0: 1(1.05,0) 2(-1.05,0)
  silkscreen extent -2.27,-0.67 0.13,0.67, body extent -1.7,-0.77 1.7,0.77, height 0.25
LED_YELLOW [mm]
  rect 1.1x1.2 smd paste+0 mask+0: 1(1.05,0) 2(-1.05,0)
  silkscreen extent -2.27,-0.67 0.13,0.67, body extent -1,-0.63 1,0.63, height 0.8
LQFP64-5W-IPC_A [mm]
  rect 1.788x0.312 smd paste+0 mask+0: 1(-5.691,3.75)
  rrect100% 1.788x0.312 smd paste+0 mask+0: 2(-5.691,3.25) 3(-5.691,2.75) 4(-5.691,2.25) 5(-5.691,1.75) 6(-5.691,1.25) 7(-5.691,0.75) 8(-5.691,0.25) 9(-5.691,-0.25) 10(-5.691,-0.75) 11(-5.691,-1.25) 12(-5.691,-1.75) 13(-5.691,-2.25) 14(-5.691,-2.75) 15(-5.691,-3.25) 16(-5.691,-3.75) 33(5.691,-3.75) 34(5.691,-3.25) 35(5.691,-2.75) 36(5.691,-2.25) 37(5.691,-1.75) 38(5.691,-1.25) 39(5.691,-0.75) 40(5.691,-0.25) 41(5.691,0.25) 42(5.691,0.75) 43(5.691,1.25) 44(5.691,1.75) 45(5.691,2.25) 46(5.691,2.75) 47(5.691,3.25) 48(5.691,3.75)
  rrect100% 0.312x1.788 smd paste+0 mask+0: 17(-3.75,-5.691) 18(-3.25,-5.691) 19(-2.75,-5.691) 20(-2.25,-5.691) 21(-1.75,-5.691) 22(-1.25,-5.691) 23(-0.75,-5.691) 24(-0.25,-5.691) 25(0.25,-5.691) 26(0.75,-5.691) 27(1.25,-5.691) 28(1.75,-5.691) 29(2.25,-5.691) 30(2.75,-5.691) 31(3.25,-5.691) 32(3.75,-5.691) 49(3.75,5.691) 50(3.25,5.691) 51(2.75,5.691) 52(2.25,5.691) 53(1.75,5.691) 54(1.25,5.691) 55(0.75,5.691) 56(0.25,5.691) 57(-0.25,5.691) 58(-0.75,5.691) 59(-1.25,5.691) 60(-1.75,5.691) 61(-2.25,5.691) 62(-2.75,5.691) 63(-3.25,5.691) 64(-3.75,5.691)
  silkscreen extent -5.82,-4.25 4.25,4.58, body extent -6,-6 6,6, height 1.6
ON_Semiconductor_936A-02_MFG [mm]
  rect 1.016x3.05 smd paste+0 mask+0: 1(-3.404,-6.485) 2(-1.702,-6.485) 3(0,-6.485) 4(1.702,-6.485) 5(3.404,-6.485)
  rect 10.66x8.38 smd paste+0 mask+0: 6(0,3.82)
  silkscreen extent -5.12,-8.73 5.12,-0.75, body extent -5.01,-7.11 5.01,7.14, height 4.83
Pin_Test_Point(Pink) [mm]
  round 2.5 hole 0.95: 1(0,0)
  body extent -1.3,-1.78 1.3,1.78, height 6.93
RES-0805 [mm]
  rect 0.8x1.25 smd mask+0.015: 1(-1,0) 2(1,0)
  silkscreen extent -1.52,-0.76 1.52,0.76, body extent -1,-0.62 1,0.63, height 0.6
RES-2512 [mm]
  rect 1.8x1.45 smd: 1(-3.275,-1.225) 1(-3.275,1.225) 2(3.275,-1.225) 2(3.275,1.225)
  silkscreen extent -4.28,-2.05 4.25,2.05, body extent -3.2,-1.6 3.2,1.6, height 0.6
RES_SMD_1210_IPC_B [mm]
  rect 1.205x2.706 smd paste+0 mask+0: 1(-1.451,0) 2(1.451,0)
  silkscreen extent -0.47,-1.25 0.47,1.25, body extent -1.6,-1.25 1.6,1.25, height 0.6
SMC/DO214AB [mm]
  rect 1.52x3.2 smd: 1(-3.105,0) 2(3.105,0)
  silkscreen extent -3.6,-3.15 3.6,3.15, body extent -3.77,-3.11 3.77,3.11, height 2.62
SO8-150 [mm]
  rect 1.5x0.6 smd: 1(-3,1.9)
  oval 1.5x0.6 smd: 2(-3,0.63) 3(-3,-0.64) 4(-3,-1.91) 5(3,-1.91) 6(3,-0.64) 7(3,0.63) 8(3,1.9)
  silkscreen extent -1.95,-2.45 1.95,2.45, body extent -3,-2.45 3,2.45, height 1.7
SOIC-8-MFG [mm]
  rect 1.98x0.53 smd paste+0 mask+0: 1(-2.465,1.905) 2(-2.465,0.635) 3(-2.465,-0.635) 4(-2.465,-1.905) 5(2.465,-1.905) 6(2.465,-0.635) 7(2.465,0.635) 8(2.465,1.905)
  silkscreen extent -4.27,-2.5 1.1,2.5, body extent -3,-2.45 3,2.45, height 1.75
SOT23-3_IPC_A [mm]
  rect 1.308x0.616 smd paste+0 mask+0: 1(-1.175,0.95)
  rrect100% 1.308x0.616 smd paste+0 mask+0: 2(-1.175,-0.95) 3(1.175,0)
  silkscreen extent -0.65,-1.45 0.65,1.45, body extent -1.2,-1.45 1.2,1.45, height 1.1
SOT-23-5 [mm]
  rect 0.9x0.65 smd: 1(-1.2,0.95) 2(-1.2,0) 3(-1.2,-0.95) 4(1.2,-0.95) 5(1.2,0.95)
  silkscreen extent -1.32,-1.55 0.35,1.95, body extent -1.4,-1.45 1.4,1.45, height 1.24
SOT-223 [mm]
  rect 1.2x2.6 smd paste+0 mask+0: 1(-2.29,-3.395)
  rrect100% 1.2x2.6 smd paste+0 mask+0: 2(0,-3.395) 3(2.29,-3.395)
  rrect59% 4x2.2 smd paste+0 mask+0: 2(0,3.395)
  silkscreen extent -3.63,-3.52 3.25,1.75, body extent -3.25,-3.53 3.25,3.53, height 1.8
SOT-223-3 [mm]
  rect 0.95x1.9 smd: 1(-2.3,-3.05) 2(0,-3.05) 3(2.3,-3.05)
  rect 3.25x1.9 smd: 2(0,3.05)
  silkscreen extent -3.3,-4.2 3.3,4.2, body extent -3.25,-3.5 3.25,3.5, height 1.7
Sullins_SWR25X-NRTC-S06-ST-BA_MFG [mm]
  rect 1.55x1.55 hole 1 paste-2539.97 mask+0: 1(-6.35,0.3)
  round 1.55 hole 1 paste-2539.97 mask+0: 2(-3.81,0.3) 3(-1.27,0.3) 4(1.27,0.3) 5(3.81,0.3) 6(6.35,0.3)
  silkscreen extent -7.8,-3.67 7.8,3.05, body extent -7.9,-3.15 7.9,3.15, height 0.25
Test_Point#1 [mm]
  round 1.8 hole 0.95: 1(0,0)
Test_Point#2 [mm]
  oval 1.8x1.5 hole 0.95: 1(0,0)
Test_Point#3 [mm]
  round 2.5 hole 0.95: 1(0,0)
Test_Point#4 [mm]
  oval 1x2 hole 0.95: 1(0,0)
Test_Point#5 [mm]
  oval 1.5x2.5 hole 0.95: 1(0,0)
Test_Point#6 [mm]
  round 2 hole 0.95: 1(0,0)
TO-264-3 [mm]
  round 3.55 hole 1.45: 1(-5.334,-0.635) 2(0,-0.635) 3(5.334,-0.635)
  silkscreen extent -10.03,-3.43 10.03,2.54, body extent -10,-3.5 10,1.5, height 30.5
US1G_SMA [mm]
  rect 2.5x1.7 smd paste+0 mask+0: 1(-2,0) 2(2,0)
  silkscreen extent -3.92,-1.46 2.3,1.46, body extent -2.6,-1.3 2.6,1.3, height 2.4
WE-PD2_1054#1 [mm] "SMD Power Inductor, 2-Leads, body 10x9mm"
  rect 3.75x9.5 smd: 1(-3.125,0) 2(3.125,0)
  silkscreen extent -5.62,-0.12 -5.38,0.13, body extent -5.04,-4.5 5.04,4.5, height 5.43
WE-PD2_1054#2 [mm] "SMD Power Inductor, 2-Leads, body 10x9mm"
  rect 3.75x9.5 smd: 1(-1273.125,-1270) 2(-1266.875,-1270)
  silkscreen extent -1275.62,-1270.13 -1275.38,-1269.88, body extent -1275.04,-1274.5 -1264.96,-1265.5, height 5.43
WE-PD2_7850 [mm] "SMD Power Inductor, 2-Leads, body 7.8x7mm"
  rect 3x7.5 smd: 1(-2.5,0) 2(2.5,0)
  silkscreen extent -4.59,-0.13 -4.34,0.12, body extent -3.81,-3.5 3.81,3.5, height 4.95
WINB-SOIC-8_M [mm]
  oval 1.9x0.65 smd: 1(-3.65,1.905) 2(-3.65,0.635) 3(-3.65,-0.635) 4(-3.65,-1.905) 5(3.65,-1.905) 6(3.65,-0.635) 7(3.65,0.635) 8(3.65,1.905)
  silkscreen extent -3.77,-2.7 2.3,2.9, body extent -2.7,-2.7 2.7,2.7, height 2.16

## Part data
C1 C2 C3 C4 C6 C9 C12 C13 C14 C15 C16 C17 C18 C20 C22 C24 C25 C26 C27 C28 C29 C31 C34 C35 C36 C38 C40 C41 C42 C45 C46 C48 C52 C53 C54 C56 C57 C59 C60 C62 C64 C65 C66 C69 C70 C72 C73 C74 C75 C76 C77 C82 C86 C87 C89 C90 C94 C97 C98 C102 C112 C115 C123 C126 C127 C138 C143: library part CAP-NON-POLAR
C5 C7 C19 C21 C23 C30 C33 C37 C39 C43 C44 C47 C49 C50 C51 C55 C61 C63 C67 C68 C92 C110 C122 C142: library part CAP-POLAR
C8 C10: library part CMP-2007-03453-2, Capacitance=10uF, Case Code (Imperial)=0805, Case Code (Metric)=2012, Dielectric=X5R, Max Operating Temperature=85°C, Min Operating Temperature=-55°C, Package Quantity=1, Tolerance=10%, Voltage=16V, Case/Package=0805, Depth=1.25mm, Height=1.25mm, Lead Free="Lead Free", Length=2mm, Material=Ceramic, Mount="Surface Mount", Packaging="Tape and Reel", Radiation Hardening=No, REACH SVHC="No SVHC", Termination=SMD/SMT, Thickness=0.053inch, Voltage Rating=16V, Voltage Rating (DC)=16V, Width=1.25mm
C11 C78 C79 C80 C81 C83 C84 C85: library part CAP-V
C32: library part CAP_POL_SMD
C58 C71 C88 C104 C117 C139: library part CAP-POLAR, "35V 220uF / 8x10.5"
D1 D2 D3 D4 D5 D6 D7 D8 D9: library part LED, "WURTH ELEKTRONIK - 151031YS06000 - LED, Yellow, Through Hole, T-1 (3mm), 30 mA, 2 V, 590 nm", Manufacturer_Name="Wurth Elektronik", Mouser Part Number=710-151031YS06000, Datasheet Link=https://katalog.we-online.de/led/datasheet/151031YS06000.pdf, Geometry.Height=5.5mm, Manufacturer_Part_Number=151031YS06000, Mouser Price/Stock=https://www.mouser.co.uk/ProductDetail/Wurth-Elektronik/151031YS06000?qs=LlUlMxKIyB3xSYYW%252BcuBiQ%3D%3D
D10: library part SS36_Schottky
DD1: library part ACS712, "ACS724  10A"
H1: "DNP"
J1 J2 J3 J4 J5 J7: library part Connector_MEIGAN_MG136HT
J6: library part DB9
J14 J16 J19 J21 J24 J26 J29 J31 J34 J36 J38 J40: library part Klema_15_A, "DNP"
J48 J49 J52 J53: library part SWR25X-NRTC-S06-ST-BA
L1 L2: library part 744776122, Case/Size Code=1054, DC Resistance=0.051Ω, DC Resistance Max=0.1Ω, Inductance=22µH, Manufacturer="Wurth Elektronik", Operating Temperature Max=125°C, Operating Temperature Min=-40°C, Rated Current=2.04A, Saturation Current=2.07A, Self Resonant Frequency=16MHz, Category="Unshielded Power Inductors", ComponentLink1Description="Website Link", ComponentLink1URL=https://www.we-online.com/redexpert/article/744776122?ad, ComponentLink2Description="Datasheet Link", ComponentLink2URL=https://www.we-online.com/redexpert/spec/744776122?ad, Height=5.4mm, Length=10mm, Manufacturer Part Number=744776122, Match Code=WE-PD2, Mount="Surface Mount", Packaging="Tape and Reel", Width=9mm, Simulation ModelName=1054_744776122_22u, Simulation PortMap=(1:1),(2:2)
L3: library part CMP-0227-00501-2, Ambient Temperature Range High=85°C, Ambient Temperature Range Low=-40°C, Current Rating=620mA, DC Resistance (DCR)=500mΩ, Inductance=270µH, Max Operating Temperature=125°C, Self Resonant Frequency=4MHz, Height=5.4mm, Length=9mm, Min Operating Temperature=-40°C, NexarPartId=24533346, Packaging=Digi-Reel®, RoHS=Compliant, Width=10mm
L4 L6 L7: library part 74477530, Case/Size Code=7850, DC Resistance=2.78Ω, DC Resistance Max=3.3Ω, Inductance=1000µH, Manufacturer="Wurth Elektronik", Operating Temperature Max=125°C, Operating Temperature Min=-40°C, Rated Current=0.3A, Self Resonant Frequency=2.4MHz, Category="Unshielded Power Inductors", ComponentLink1Description="Website Link", ComponentLink1URL=https://www.we-online.com/redexpert/article/74477530?ad, ComponentLink2Description="Datasheet Link", ComponentLink2URL=https://www.we-online.com/redexpert/spec/74477530?ad, Height=4.95mm, Length=7.8mm, Manufacturer Part Number=74477530, Match Code=WE-PD2, Mount="Surface Mount", Packaging="Tape and Reel", Saturation Current=0.3A, Width=7mm, Simulation ModelName=7850_74477530_1m, Simulation ModelText="******* / .subckt 7850_74477530_1m 1 2 / Rp 1 2 187304.915771 / Cp 1 2 4.36976277949p / Rs 1 N3 3.3 / L1 N3 2 1000u / .ends 7850_74477530_1m", Simulation PortMap=(1:1),(2:2)
P1 P8 P9 P10: "WR-TBL Series 3055 PCB Header Horizontal Entry with Plastic Latches, THT, pitch 5.08mm, 2p", Manufacturer="Wurth Elektronik", Operating Temperature Max=105°C, Operating Temperature Min=-40°C, Rated Current=16A, Working Voltage=300V, Application=Pluggable, Category="Terminal Blocks", ComponentLink1Description="Website Link", ComponentLink1URL=https://www.we-online.com/redexpert/article/691305540002?ad, ComponentLink2Description="Datasheet Link", ComponentLink2URL=https://www.we-online.com/redexpert/spec/691305540002?ad, Manufacturer Part Number=691305540002, Match Code=WR-TBL, Modularity=No, Mount="Through Hole", Number of Pins=2, Number of Rows=1, Orientation=Horizontal, Packaging=Box, Pitch=5.08mm
P4 P5 P13 P14 P15: "WR-WTB THT Male Vertical Locking Header, pitch 2.54mm, 3p", Contact Resistance=20mOhm, Operating Temperature="-40 to +105degC", Rated Current=3A, Withstanding Voltage=1000VAC, Working Voltage=250VAC, ComponentLink1Description=Manufacturer, ComponentLink1URL=http://www.we-online.de, ComponentLink2Description=Datasheet, ComponentLink2URL=https://www.we-online.com/catalog/datasheet/61900311121.pdf, Gender=Male, Mounting Technology=THT, Packaging=Bag, Part Number=61900311121, Pin Number=3, Pitch=2.54mm, Published Date="January 2020", Publisher="Wurth Elektronik", Type=Vertical
P6 P7: "WR-TBL Series 3055 PCB Header Horizontal Entry with Plastic Latches, THT, pitch 5.08mm, 3p", Manufacturer="Wurth Elektronik", Operating Temperature Max=105°C, Operating Temperature Min=-40°C, Rated Current=16A, Working Voltage=300V, Application=Pluggable, Category="Terminal Blocks", ComponentLink1Description="Website Link", ComponentLink1URL=https://www.we-online.com/redexpert/article/691305540003?ad, ComponentLink2Description="Datasheet Link", ComponentLink2URL=https://www.we-online.com/redexpert/spec/691305540003?ad, Manufacturer Part Number=691305540003, Match Code=WR-TBL, Modularity=No, Mount="Through Hole", Number of Pins=3, Number of Rows=1, Orientation=Horizontal, Packaging=Box, Pitch=5.08mm
Q1 Q2 Q3: library part BC847C_Infineon, "NPN Silicon AF Transistor, 45 V VCEO, 100 mA IC, SOT23, Reel, Green", Manufacturer=Infineon, ComponentLink1Description="Manufacturer URL", ComponentLink1URL=http://www.infineon.com/, ComponentLink2Description=Datasheet, ComponentLink2URL=http://www.infineon.com/dgdl/bc847series_bc848series_bc849series_bc850series.pdf?folderId=db3a304314dca389011541d30fa21656&fileId=db3a304314dca389011541d4630a1657, ComponentLink3Description="Package Specification", ComponentLink3URL=http://www.infineon.com/dgdl/SOT23-Package_Overview.pdf?folderId=db3a30431936bc4b0119532290053c66&fileId=db3a30431936bc4b0119533468123c85, fT (typ)="250Â MHz", Green=TRUE, IBM (max)="200Â mA", IC (max)="100Â mA", ICBO (max)="15Â nA", ICM (max)="200Â mA", Mounting Technology="Surface Mount", PackageDescription="3-Pin Small Outline Transistor Package, 1.3 x 2.9 mm Body, 0.95 mm Pitch", PackageReference=SOT23, PackageVersion=Apr-08, Packing=Reel, PartNumber=BC847C, Polarity=NPN, Ptot (max)="330Â mW", VCBO (max)="50Â V", VCEO (max)="45Â V", VEBO (max)="6Â V"
Q4: "P-mosfet"
R1 R2 R3 R4 R5 R6 R7 R8 R9 R10 R11 R12 R13 R14 R15 R16 R17 R18 R19 R20 R21 R22 R23 R24 R25 R26 R27 R28 R29 R30 R31 R32 R33 R34 R35 R36 R37 R38 R39 R40 R41 R42 R43 R44 R45 R46 R47 R48 R49 R50 R51 R52 R53 R54 R55 R56 R57 R58 R59 R60 R61 R62 R63 R64 R65 R66 R67 R68 R69 R72 R73 R76 R77 R78 R79 R81 R82 R83 R84 R85 R86 R87 R88 R89 R90 R91 R92 R93 R94 R95 R96 R97 R98 R99 R100 R101 R102 R103 R104 R105 R106 R107 R108 R109 R110 R111 R112 R113 R114 R115 R116 R117 R118 R119 R120 R121 R122 R123 R124 R125 R126 R127 R128 R131 R132 R135 R136 R140 R143 R146 R147 R149 R152 R153: library part RES-CONST
R70 R71: library part RES-CONST, "100K 1%"
R74: library part RES-CONST, "100K  1%"
R75: library part RES-CONST, "1K 1%  (DNP)"
R80: library part RES_1210